# Altium PCB PB-PCB1.PcbDoc (part 3 of 4)
Units mm, origin at the board's own origin, x right, y up, seen from the top; angles counter-clockwise.
Board outline 179 x 85 mm, 2 copper layers (Top Layer, Bottom Layer); 468 components, 249 nets, 1291 pads, 562 vias.
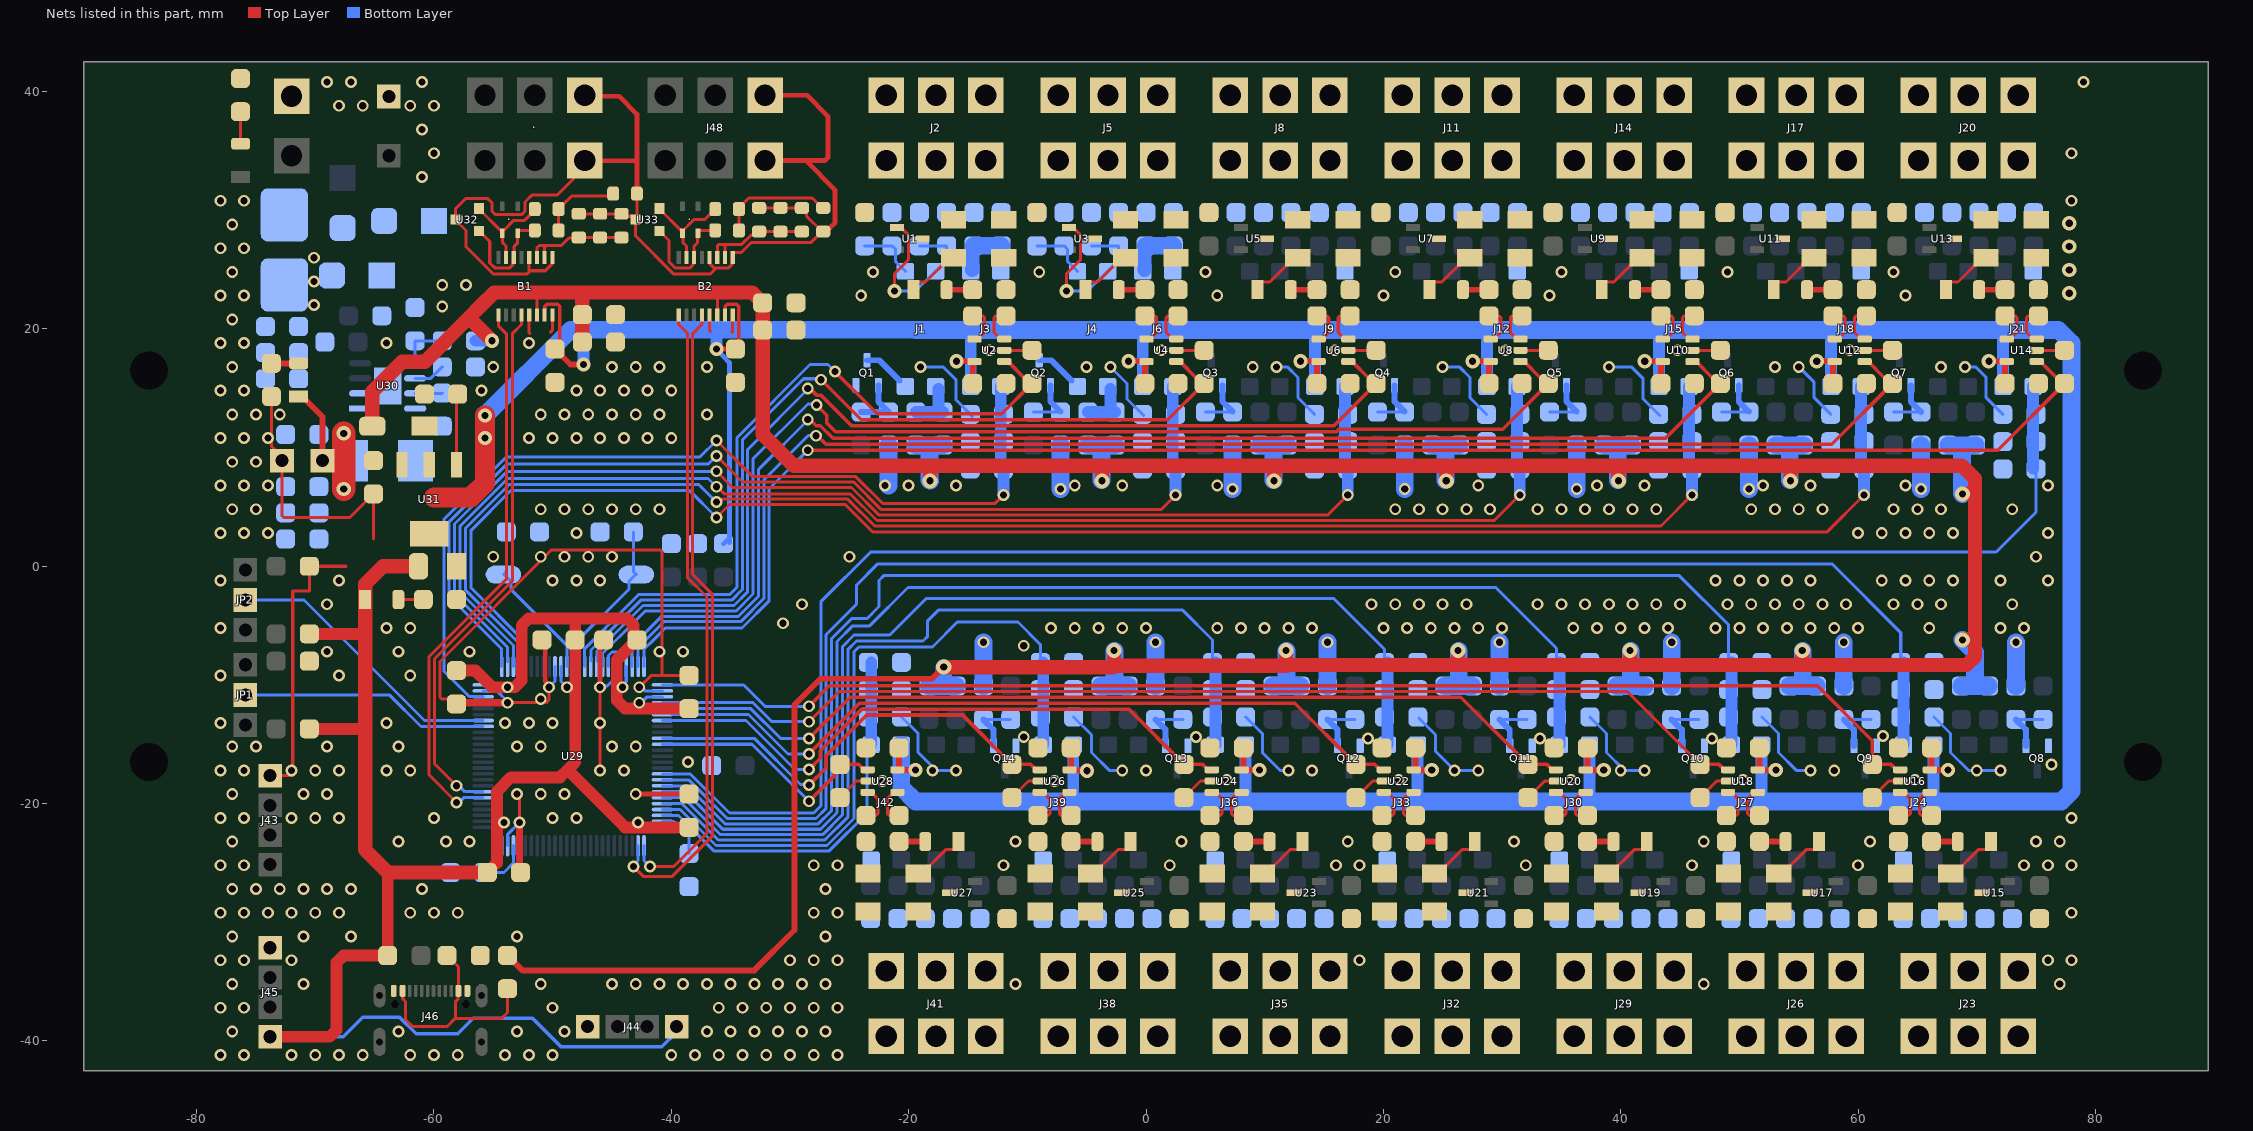
[diagram p2: the nets of this part, all layers, seen from the top]

## Via types
v1: diameter 1, hole 0.6, Top Layer to Bottom Layer, tented both sides, 509 vias
v2: diameter 1.2, hole 0.6, Top Layer to Bottom Layer, tented both sides, 39 vias
v3: diameter 1.27, hole 0.6, Top Layer to Bottom Layer, tented both sides, 14 vias

## Nets (pads, with @x,y where several pads share a name; then routed paths per layer and width w, separated by ;. In a path a pad name is that pad's centre, name@x,y a point inside that pad or via, vN(x,y) a via of type N, cw(c..) or ccw(c..) an arc to the next point about the centre after c; other vN are vias at no path point)
3v3MCU: B1.7 B2.7 C1.2 C4.2 C7.2 C10.2 C13.2 C16.2 C19.2 C22.2 C25.2 C28.2 C31.2 C34.2 C37.2 C40.2 C50.2 C51.2 C52.2 C53.2 C54.2 C55.2 C68.1 C69.1 C73.1 C80.1 D48.1 D49.1 J3.4 J6.4 J9.4 J12.4 J15.4 J18.4 J21.4 J24.4 J27.4 J30.4 J33.4 J36.4 J39.4 J42.4 J44.1 J45.1 R212.2 R213.2 R214.1 R216.2 U2.5 U4.5 U6.5 U8.5 U10.5 U12.5 U14.5 U16.5 U18.5 U20.5 U22.5 U24.5 U26.5 U28.5 U29.11 U29.19 U29.21 U29.22 U29.28 U29.50 U29.75 U29.100 U31.2 U31.4 | length 651.9
  Top Layer w0.3: B1.7@-50.675,21.175 -50.65,21.2 -50.65,21.899 -50.474,22.075 -49.576,22.075 -49.4,21.899 -49.4,18.7 C73.1@-49.8,18.3 ; B2.7@-35.45,21.2 -35.45,21.899 -35.274,22.075 -34.505,22.075 -34.3,21.87 -34.3,18.6 C80.1@-34.6,18.3 ; U28.5@-20.945,-17.15 U28.5@-20.92,-17.175 ; U2.5@-14.48,17.275 U2.5@-14.455,17.25 ; U4.5@0.02,17.275 U4.5@0.045,17.25 ; U24.5@8.055,-17.15 U24.5@8.08,-17.175 ; U6.5@14.52,17.275 U6.5@14.545,17.25 ; U22.5@22.555,-17.15 U22.5@22.58,-17.175 ; U8.5@29.02,17.275 U8.5@29.045,17.25 ; U20.5@37.055,-17.15 U20.5@37.08,-17.175 ; U10.5@43.52,17.275 U10.5@43.545,17.25 ; U18.5@51.555,-17.15 U18.5@51.58,-17.175 ; U12.5@58.02,17.275 U12.5@58.045,17.25 ; U16.5@66.055,-17.15 U16.5@66.08,-17.175 ; U14.5@72.52,17.275 U14.5@72.545,17.25
  Top Layer w0.4: v2(-36.2,18.3) C80.1@-34.6,18.3
  Top Layer w0.5: C73.1@-49.8,18.3 -48.5,17 v2(-47.4,17) ; U28.5@-20.92,-17.175 v2(-19.425,-17.175) ; U28.5@-20.8,-17.005 C40.2@-20.8,-15.3 ; v2(-15.975,17.275) U2.5@-14.48,17.275 ; C1.2@-14.6,15.4 U2.5@-14.6,17.105 ; U26.5@-6.3,-17.175 -6.285,-17.19 -5.021,-17.19 v2(-4.98,-17.23) ; U26.5@-6.3,-17.005 C37.2@-6.3,-15.3 ; v2(-1.475,17.275) U4.5@0.02,17.275 ; C4.2@-0.1,15.4 U4.5@-0.1,17.105 ; U24.5@8.08,-17.175 v2(9.575,-17.175) ; U24.5@8.2,-17.005 C34.2@8.2,-15.3 ; v2(13.025,17.275) U6.5@14.52,17.275 ; C7.2@14.4,15.4 U6.5@14.4,17.105 ; U22.5@22.58,-17.175 v2(24.075,-17.175) ; U22.5@22.7,-17.005 C31.2@22.7,-15.3 ; v2(27.525,17.275) U8.5@29.02,17.275 ; C10.2@28.9,15.4 U8.5@28.9,17.105 ; U20.5@37.08,-17.175 v2(38.575,-17.175) ; U20.5@37.2,-17.005 C28.2@37.2,-15.3 ; v2(42.025,17.275) U10.5@43.52,17.275 ; C13.2@43.4,15.4 U10.5@43.4,17.105 ; U18.5@51.58,-17.175 v2(53.075,-17.175) ; U18.5@51.7,-17.005 C25.2@51.7,-15.3 ; v2(56.525,17.275) U12.5@58.02,17.275 ; C16.2@57.9,15.4 U12.5@57.9,17.105 ; U16.5@66.08,-17.175 v2(67.575,-17.175) ; U16.5@66.2,-17.005 C22.2@66.2,-15.3 ; v2(71.025,17.275) U14.5@72.52,17.275 ; C19.2@72.4,15.4 U14.5@72.4,17.105
  Top Layer w1: J45.1@-73.8,-39.65 -68.786,-39.65 -68.2,-39.064 -68.2,-33.386 -67.614,-32.8 R214.1@-63.9,-32.8 -63.9,-25.8 ; R213.2@-70.5,-13.7 -65.8,-13.7 ; R216.2@-70.5,-5.7 -65.949,-5.7 -65.8,-5.551 ; C51.2@-58.1,-8.8 -56.5,-8.8 -55.1,-10.2 -53.186,-10.2 -52.6,-9.614 -52.6,-4.986 -52.014,-4.4 -48.1,-4.4 ; C55.2@-55.527,-25.827 C55.2@-55.5,-25.8 -54.7,-25 -54.7,-21.6 ; v1(-54.1,-21.6) -54.7,-21.6 ; v1(-48.8,-10.2) -48.1,-10.2 ; v1(-44.1,-10.2) v1@-44.6,-10.2 ; C50.2@-38.5,-22 -43.9,-22 -48.743,-17.157 ; C53.2@-38.5,-12 -42.2,-12 -43.9,-12 -44.6,-11.3 v1@-44.6,-10.2 ; -54.7,-21.6 -54.7,-18.986 -53.514,-17.8 -49.386,-17.8 -48.743,-17.157 ; -48.743,-17.157 -48.1,-16.514 -48.1,-10.2 ; -48.1,-10.2 C54.2@-48.1,-6.2 -48.1,-4.4 ; -48.1,-4.4 -43.759,-4.4 -43.173,-4.986 -43.173,-5.927 C52.2@-42.9,-6.2 -44.6,-7.9 v1@-44.6,-10.2
  Top Layer w1.2: C68.1@-61.3,0 -64.3,0 -65.8,-1.5 D48.1@-65.8,-2.8 -65.8,-5.551 -65.8,-13.7 -65.8,-23.9 -63.9,-25.8 C55.2@-55.5,-25.8
  Top Layer w1.7: -60,5.8 -56.9,5.8 -55.7,7 v2(-55.7,10.8) v2(-55.7,12.7)
  Bottom Layer w0.254: U29.100@-55.85,-10 v1@-54.202,-10 ; U29.75@-54.3,-23.55 v1@-54.3,-22.002 ; U29.11@-49.3,-8.45 -49.3,-9.7 v1(-48.8,-10.2) ; U29.19@-45.3,-8.45 -45.291,-8.441 -45.291,-7.517 -44.998,-7.223 -44.602,-7.223 -44.323,-7.502 -44.323,-7.665 -44.3,-7.688 U29.21@-44.3,-8.45 ; v1(-42.8,-21.6) -42.598,-21.6 -42.198,-22 U29.50@-40.75,-22 ; v1@-42.531,-11.5 -42.031,-11 U29.28@-40.75,-11
  Bottom Layer w0.28: v1@-44.3,-9.798 U29.21@-44.3,-8.45 ; v1@-44.1,-10.007 -43.8,-9.707 U29.22@-43.8,-8.45
  Bottom Layer w0.3: J45.1@-73.8,-39.65 -67.65,-39.65 -66,-38 -62.9,-38 -61.5,-39.4 -58,-39.4 -56.7,-38.1 -51.7,-38.1 -49.3,-40.5 -40.8,-40.5 -39.55,-39.25 J44.1@-39.55,-38.8 ; -16,19.92 -15.975,19.895
  Bottom Layer w0.4: v2(-36.2,18.3) -36.2,18.266 -35.6,17.666 -35.1,17.166 R212.2@-35.1,2 ; R212.2@-35.6,1.9 R212.2@-35.123,2.377
  Bottom Layer w0.5: v2(-15.975,17.275) -14.845,17.275 -14.77,17.2 ; -6.13,-17.2 -5.011,-17.2 v2(-4.98,-17.23) ; v2(-1.475,17.275) -1.45,17.3 -0.27,17.3 ; 8.37,-17.2 8.395,-17.175 v2(9.575,-17.175) ; v2(13.025,17.275) 14.155,17.275 14.23,17.2 ; 22.87,-17.2 24.05,-17.2 v2(24.075,-17.175) ; v2(27.525,17.275) 28.705,17.275 28.73,17.3 ; 37.37,-17.2 37.395,-17.175 v2(38.575,-17.175) ; v2(42.025,17.275) 43.205,17.275 43.23,17.3 ; 51.87,-17.2 53.05,-17.2 v2(53.075,-17.175) ; v2(56.525,17.275) 56.55,17.3 57.73,17.3 ; 66.37,-17.2 66.395,-17.175 v2(67.575,-17.175) ; v2(71.025,17.275) 72.155,17.275 72.23,17.2
  Bottom Layer w1: v2(-47.4,17) -47.4,19.92 ; v2(-36.2,18.3) -36.2,19.183 ; -20.63,-17.2 -19.45,-17.2 v2(-19.425,-17.175) ; J3.4@-14.77,15.15 -14.77,17.2 -14.77,19.92 ; -6.13,-19.82 -6.13,-17.2 J39.4@-6.13,-15.05 ; J6.4@-0.27,15.15 -0.27,17.3 -0.27,19.92 ; 8.37,-19.82 8.37,-17.2 J36.4@8.37,-15.05 ; J9.4@14.23,15.15 14.23,17.2 14.23,19.92 ; 22.87,-19.82 22.87,-17.2 J33.4@22.87,-15.05 ; J12.4@28.73,15.15 28.73,17.3 28.73,19.92 ; 37.37,-19.82 37.37,-17.2 J30.4@37.37,-15.05 ; J15.4@43.23,15.15 43.23,17.3 43.23,19.92 ; 51.87,-19.82 51.87,-17.2 J27.4@51.87,-15.05 ; J18.4@57.73,15.15 57.73,17.3 57.73,19.92 ; 66.37,-19.82 66.37,-17.2 J24.4@66.37,-15.05 ; J21.4@72.23,15.15 72.23,17.2 72.23,19.92
  Bottom Layer w1.5: v2(-55.7,12.7) -48.48,19.92 -47.4,19.92 ; -47.4,19.93 -36.2,19.93 -19.41,19.93 ; J42.4@-20.63,-15.05 -20.63,-17.2 -20.63,-18.615 -19.425,-19.82 -16,-19.82 -8.67,-19.82 -6.13,-19.82 -4.925,-19.82 -1.5,-19.82 5.83,-19.82 8.37,-19.82 9.575,-19.82 13,-19.82 20.33,-19.82 22.87,-19.82 24.075,-19.82 27.5,-19.82 34.83,-19.82 37.37,-19.82 38.575,-19.82 42,-19.82 49.33,-19.82 51.87,-19.82 53.075,-19.82 56.5,-19.82 63.83,-19.82 66.37,-19.82 67.575,-19.82 71,-19.82 76.18,-19.82 77.121,-19.82 78,-18.941 78,-18 78,18.8 76.88,19.92 72.23,19.92 71.025,19.92 67.6,19.92 60.27,19.92 57.73,19.92 56.525,19.92 53.1,19.92 45.77,19.92 43.23,19.92 42.025,19.92 38.6,19.92 31.27,19.92 28.73,19.92 27.525,19.92 24.1,19.92 16.77,19.92 14.23,19.92 13.025,19.92 9.6,19.92 2.27,19.92 -0.27,19.92 -1.475,19.92 -4.9,19.92 -12.23,19.92 -14.77,19.92 -15.975,19.92 -19.4,19.92
  Bottom Layer w1.7: v2(-55.7,10.8) v2(-55.7,12.7)
  other v1: -42.7,-11.5 -53.8,-10.2
5vMCU: B1.6 B2.6 C62.1 C63.1 C64.1 C65.1 C66.1 C67.1 C71.2 C72.2 C78.2 C79.2 D47.1 D49.2 FUSE_SMD1.1 L1.2 R4.2 R5.2 R19.2 R20.2 R34.2 R35.2 R49.2 R50.2 R64.2 R65.2 R79.2 R80.2 R94.2 R95.2 R109.2 R110.2 R124.2 R125.2 R139.2 R140.2 R154.2 R155.2 R169.2 R170.2 R184.2 R185.2 R199.2 R200.2 R221.2 U31.3 | length 430
  Top Layer w0.254: B1.6@-51.325,21.175 -51.325,23.075 ; B2.6@-36.125,21.175 -36.125,23.05
  Top Layer w0.5: D47.1@-71.4,14.3 -71.1,14.3 -69.4,12.6 C66.1@-69.4,8.9 ; FUSE_SMD1.1@-53.8,-32.8 -52.55,-34.05 -33.006,-34.05 -29.613,-30.657 -29.613,-11.67 -27.425,-9.481 -18.028,-9.481 -17.052,-8.505 v3(-17.045,-8.505)
  Top Layer w1.2: D49.2@-65.2,11.8 -65.2,14.7 -62.667,17.233 -60.767,17.233 -57,21 ; v2(-55.1,19) -57,20.9 -57,21 ; C72.2@-47.5,18.9 C71.2@-47.5,21.2 -47.5,23.075 ; -36.125,23.05 -36.1,23.075 ; v3(-18.2,7.2) -18.2,8.317 -18.358,8.475 ; v3(-17.045,-8.505) -2.78,-8.505 -2.65,-8.375 ; v3(-3.7,7.2) -3.7,8.425 -3.75,8.475 ; v3(-2.7,-7.1) -2.7,-8.325 -2.65,-8.375 ; v3(10.8,7.2) 10.8,8.425 10.75,8.475 ; v3(11.8,-7.1) 11.8,-8.325 ; v3(25.3,7.2) 25.3,8.425 25.25,8.475 ; v3(26.3,-7.1) 26.3,-8.325 ; v3(39.8,7.2) 39.8,8.425 39.75,8.475 ; v3(40.8,-7.1) 40.8,-8.325 ; v3(54.3,7.2) 54.3,8.425 54.25,8.475 ; v3(55.3,-7.1) 55.3,-8.325 ; v3(68.8,-6.2) 69.85,-6.2 ; v3(68.8,6.1) 69.85,6.1 ; -57,21 -56.097,21.903 -54.925,23.075 -51.325,23.075 -47.5,23.075 ; -47.5,23.075 -36.1,23.075 ; -36.1,23.075 -33.175,23.075 C79.2@-32.3,22.2 C78.2@-32.3,19.9 -32.3,11.1 -29.675,8.475 -18.358,8.475 ; -18.358,8.475 -3.75,8.475 ; -3.75,8.475 10.75,8.475 ; -2.65,-8.375 11.85,-8.375 11.8,-8.325 ; 10.75,8.475 25.25,8.475 ; 11.8,-8.325 26.3,-8.325 ; 25.25,8.475 39.75,8.475 ; 26.3,-8.325 40.8,-8.325 ; 39.75,8.475 54.25,8.475 ; 40.8,-8.325 55.3,-8.325 ; 54.25,8.475 68.75,8.475 69.85,7.375 69.85,6.1 ; 55.3,-8.325 69.147,-8.325 69.85,-7.622 69.85,-6.2 ; 69.85,-6.2 69.85,6.1
  Top Layer w2: v2(-67.6,6.5) v2(-67.6,11.2)
  Bottom Layer w1: R221.2@-56.5,19 v2(-55.1,19)
  Bottom Layer w1.4: -17.15,-10.1 -17.045,-9.995 v3(-17.045,-8.505)
  Bottom Layer w1.5: R4.2@-19.4,10.2 -18.25,10.2 ; R200.2@-18.3,-10.1 -17.15,-10.1 R199.2@-16,-10.1 ; v3(-18.2,7.2) -18.25,7.25 -18.25,10.2 ; R5.2@-17.1,10.2 -18.25,10.2 ; R19.2@-4.9,10.2 -3.75,10.2 ; R185.2@-3.8,-10.1 -2.65,-10.1 ; v3@-3.75,7.25 -3.75,10.2 ; v3@-2.65,-7.15 -2.65,-10.1 ; R20.2@-2.6,10.2 -3.75,10.2 ; R184.2@-1.5,-10.1 -2.65,-10.1 ; R34.2@9.6,10.2 10.75,10.2 ; R170.2@10.7,-10.1 11.85,-10.1 ; v3@10.75,7.25 10.75,10.2 ; v3@11.85,-7.15 11.85,-10.1 ; R35.2@11.9,10.2 10.75,10.2 ; R169.2@13,-10.1 11.85,-10.1 ; R49.2@24.1,10.2 25.25,10.2 ; R155.2@25.2,-10.1 26.35,-10.1 ; v3@25.25,7.25 25.25,10.2 ; v3@26.35,-7.15 26.35,-10.1 ; R50.2@26.4,10.2 25.25,10.2 ; R154.2@27.5,-10.1 26.35,-10.1 ; R64.2@38.6,10.2 39.75,10.2 ; R140.2@39.7,-10.1 40.85,-10.1 ; v3@39.75,7.25 39.75,10.2 ; v3@40.85,-7.15 40.85,-10.1 ; R65.2@40.9,10.2 39.75,10.2 ; R139.2@42,-10.1 40.85,-10.1 ; R79.2@53.1,10.2 54.25,10.2 ; R125.2@54.2,-10.1 55.35,-10.1 ; v3@54.25,7.25 54.25,10.2 ; v3@55.35,-7.15 55.35,-10.1 ; R80.2@55.4,10.2 54.25,10.2 ; R124.2@56.5,-10.1 55.35,-10.1 ; R94.2@67.6,10.2 68.75,10.2 ; R110.2@68.7,-10.1 69.85,-10.1 ; v3(68.8,-6.2) 69.85,-7.25 69.85,-10.1 ; v3(68.8,6.1) 68.75,6.15 68.75,10.2 ; R95.2@69.9,10.2 68.75,10.2 ; R109.2@71,-10.1 69.85,-10.1
24vMCU2: C59.1 C60.1 C61.1 D45.2 FH1.2 J2.2 J5.2 J8.2 J11.2 J14.2 J17.2 J20.2 J23.2 J26.2 J29.2 J32.2 J35.2 J38.2 J41.2 R1.1 R2.1 R3.1 R16.1 R17.1 R18.1 R31.1 R32.1 R33.1 R46.1 R47.1 R48.1 R61.1 R62.1 R63.1 R76.1 R77.1 R78.1 R91.1 R92.1 R93.1 R106.1 R107.1 R108.1 R121.1 R122.1 R123.1 R136.1 R137.1 R138.1 R151.1 R152.1 R153.1 R166.1 R167.1 R168.1 R181.1 R182.1 R183.1 R196.1 R197.1 R198.1 R222.1 U30.2
  other v1: -59.3,21.9 -70.1,22 -59.3,23.7 -57.3,23.7 -70.1,24 -70.1,26
analog_in_1: C2.1 U2.1 U29.15 | length 62.4
  Top Layer w0.3: v1(-26.2,16.4) -22.645,12.845 -12.155,12.845 C2.1@-9.6,15.4 -10.096,15.896 -10.281,15.896 -11.635,17.25 U2.1@-11.945,17.25
  Bottom Layer w0.254: U29.15@-47.3,-8.45 -47.3,-6.942 -43.734,-3.376 -42.758,-2.4 -35.1,-2.4 -34.473,-1.773 -34.473,10.827 -34.324,10.976 -28.305,16.995 -26.795,16.995 v1(-26.2,16.4)
analog_in_2: C5.1 U4.1 U29.16 | length 75.3
  Top Layer w0.3: v1(-27.374,15.718) -25.855,14.199 -24,12.345 1.845,12.345 C5.1@4.9,15.4 4.404,15.896 4.219,15.896 2.865,17.25 U4.1@2.555,17.25
  Bottom Layer w0.254: U29.16@-46.777,-8 -46.777,-7.061 -43.546,-3.83 -42.57,-2.854 -34.912,-2.854 -34.019,-1.961 -34.019,10.639 -33.87,10.788 -28.94,15.718 -28.924,15.718 -28.843,15.8 -27.455,15.8 v1(-27.374,15.718)
analog_in_3: C8.1 U6.1 U29.17 | length 88.6
  Top Layer w0.3: v1(-28.5,14.973) -28.311,14.973 -27.763,14.425 -27.398,14.425 -24.818,11.845 15.845,11.845 C8.1@19.4,15.4 18.904,15.896 18.719,15.896 17.365,17.25 U6.1@17.055,17.25
  Bottom Layer w0.254: U29.17@-46.277,-8 -46.277,-7.203 -43.358,-4.284 -42.382,-3.308 -34.724,-3.308 -33.565,-2.149 -33.565,9.846 -33.416,9.995 v1@-28.439,14.973
analog_in_4: C11.1 U8.1 U29.18 | length 102.3
  Top Layer w0.3: v1(-27.75,13.575) -26.888,12.713 -26.888,12.073 -26.16,11.345 16.052,11.345 16.257,11.55 30.05,11.55 C11.1@33.9,15.4 33.404,15.896 33.219,15.896 31.865,17.25 U8.1@31.555,17.25
  Bottom Layer w0.254: U29.18@-45.8,-8.45 -45.791,-8.441 -45.791,-7.359 -43.17,-4.738 -42.194,-3.762 -34.536,-3.762 -33.111,-2.337 -33.111,9.051 -32.962,9.2 -28.489,13.673 -27.849,13.673 v1(-27.75,13.575)
analog_in_5: C14.1 U10.1 U29.23 | length 113.3
  Top Layer w0.3: v1(-28.5,12.374) -28.311,12.374 -27.786,11.85 -27.448,11.85 -26.373,10.775 43.775,10.775 C14.1@48.4,15.4 47.904,15.896 47.719,15.896 46.365,17.25 U10.1@46.055,17.25
  Bottom Layer w0.254: U29.23@-43.3,-8.45 -43.3,-6.716 -41.776,-5.192 -40.8,-4.216 -34.348,-4.216 -32.657,-2.525 -32.657,8.157 -32.508,8.306 v1@-28.44,12.374
analog_in_6: C17.1 U12.1 U29.24 | length 126.1
  Top Layer w0.3: v1(-27.8,11) -27.694,11 -26.969,10.275 57.775,10.275 C17.1@62.9,15.4 62.404,15.896 62.219,15.896 60.865,17.25 U12.1@60.555,17.25
  Bottom Layer w0.254: U29.24@-42.8,-8.45 -42.791,-8.441 -42.791,-6.849 -41.588,-5.646 -40.612,-4.67 -34.16,-4.67 -32.203,-2.713 -32.203,7.272 -32.054,7.421 -28.456,11.019 -28.019,11.019 -28,11 v1(-27.8,11)
analog_in_7: C20.1 U14.1 U29.25 | length 139
  Top Layer w0.3: v1@-28.4,9.775 71.775,9.775 C20.1@77.4,15.4 76.904,15.896 76.719,15.896 75.365,17.25 U14.1@75.055,17.25
  Bottom Layer w0.254: U29.25@-42.3,-8.45 -42.3,-7 -41.4,-6.1 -40.5,-5.2 -34.048,-5.2 -31.749,-2.901 -31.749,6.522 -31.6,6.671 v1@-28.496,9.775
  other v1: -28.5,9.775
analog_in_8: C23.1 U16.1 U29.26 | length 109.9
  Top Layer w0.3: v1(-28.4,-11.8) -26.681,-10.081 56.581,-10.081 61.2,-14.7 C23.1@61.2,-16.7 62.785,-16.7 63.235,-17.15 U16.1@63.545,-17.15
  Bottom Layer w0.254: U29.26@-40.75,-10 -33.9,-10 -32.1,-11.8 v1(-28.4,-11.8)
analog_in_9: C26.1 U18.1 U29.29 | length 94.2
  Top Layer w0.254: v1(-28.4,-13.1) -25.858,-10.558 40.558,-10.558 C26.1@46.7,-16.7
  Top Layer w0.3: C26.1@46.7,-16.7 48.285,-16.7 48.735,-17.15 U18.1@49.045,-17.15
  Bottom Layer w0.254: U29.29@-40.75,-11.5 -33.108,-11.5 -31.508,-13.1 v1(-28.4,-13.1)
analog_in_10: C29.1 U20.1 U29.30 | length 80.3
  Top Layer w0.3: v1(-28.4,-14.5) -24.935,-11.035 26.535,-11.035 C29.1@32.2,-16.7 33.785,-16.7 34.235,-17.15 U20.1@34.545,-17.15
  Bottom Layer w0.254: U29.30@-40.75,-12 -33.3,-12 -30.8,-14.5 v1(-28.4,-14.5)
analog_in_11: C32.1 U22.1 U29.31 | length 65.5
  Top Layer w0.3: v1(-28.4,-15.829) -28.4,-15.793 -24.142,-11.535 12.535,-11.535 C32.1@17.7,-16.7 19.285,-16.7 19.735,-17.15 U22.1@20.045,-17.15
  Bottom Layer w0.254: U29.31@-39.954,-12.5 -33.5,-12.5 -30.171,-15.829 v1(-28.4,-15.829)
analog_in_12: C35.1 U24.1 U29.32 | length 52.6
  Top Layer w0.3: v1(-28.4,-17.129) -27.45,-16.179 -27.45,-15.55 -23.935,-12.035 -1.465,-12.035 C35.1@3.2,-16.7 4.785,-16.7 5.235,-17.15 U24.1@5.545,-17.15
  Bottom Layer w0.254: U29.32@-40.75,-13 -33.7,-13 -29.571,-17.129 v1(-28.4,-17.129)
analog_in_13: C38.1 U26.1 U29.35 | length 38.4
  Top Layer w0.3: v1(-28.402,-18.429) -26.95,-16.977 -26.95,-15.95 -23.535,-12.535 -15.465,-12.535 C38.1@-11.3,-16.7 -9.715,-16.7 -9.265,-17.15 U26.1@-8.955,-17.15
  Bottom Layer w0.254: U29.35@-40.75,-14.5 -33,-14.5 -29.106,-18.394 -28.436,-18.394 v1(-28.402,-18.429)
analog_in_14: C41.1 U28.1 U29.36 | length 21
  Top Layer w0.3: v1(-28.4,-19.8) -27.722,-19.122 -26.251,-17.651 -26.251,-17.151 C41.1@-25.8,-16.7 -24.215,-16.7 -23.765,-17.15 U28.1@-23.455,-17.15
  Bottom Layer w0.254: U29.36@-40.75,-15 -33.2,-15 v1(-28.4,-19.8)
Boot0: JP2.2 U29.94 | length 24.3
  Bottom Layer w0.254: JP2.2@-75.9,-2.84 -70.96,-2.84 -60.8,-13 U29.94@-55.85,-13
com1: J2.6 R12.2 R13.2
com2: J5.6 R27.2 R28.2
com3: J8.6 R42.2 R43.2
com4: J11.6 R57.2 R58.2
com5: J14.6 R72.2 R73.2
com6: J17.6 R87.2 R88.2
com7: J20.6 R102.2 R103.2
com8: J23.6 R117.2 R118.2
com9: J26.6 R132.2 R133.2
com10: J29.6 R147.2 R148.2
com11: J32.6 R162.2 R163.2
com12: J35.6 R177.2 R178.2
com13: J38.6 R192.2 R193.2
com14: J41.6 R207.2 R208.2
digital_in_1: C3.1 J3.3 R14.2 R15.2 U29.98 | length 78.5
  Top Layer w0.254: v1(-36.2,10.6) -33.148,7.548 -24.448,7.548 -22.2,5.3 -12.7,5.3 v1(-12,6)
  Bottom Layer w0.254: U29.98@-55.85,-11 -55.859,-10.991 -57.009,-10.991 -59.17,-8.83 -59.17,3.94 -53.91,9.2 -37.6,9.2 v1(-36.2,10.6)
  Bottom Layer w1: R14.2@-12.245,8.215 -12.245,10.5 -12.245,12.8 J3.3@-12.245,15.135 ; v1(-12,6) R14.2@-12,8.2
digital_in_2: C6.1 J6.3 R29.2 R30.2 U29.1 | length 89
  Top Layer w0.254: v1(-36.2,9.3) -33.994,7.094 -24.636,7.094 -22.342,4.8 1.3,4.8 v1(2.5,6)
  Bottom Layer w0.254: U29.1@-54.3,-8.45 -54.3,-6.968 -58.716,-2.552 -58.716,3.752 -53.868,8.6 -36.9,8.6 v1(-36.2,9.3)
  Bottom Layer w1: R29.2@2.255,8.215 2.255,10.5 2.255,12.8 J6.3@2.255,15.135 ; v1(2.5,6) R29.2@2.5,8.2
digital_in_3: C9.1 J9.3 R44.2 R45.2 U29.2 | length 101.9
  Top Layer w0.254: v1(-36.2,8) -34.84,6.64 -24.824,6.64 -22.484,4.3 15.3,4.3 v1(17,6)
  Bottom Layer w0.254: U29.2@-53.8,-8.069 -53.8,-6.826 -58.262,-2.364 -58.262,3.564 -53.826,8 v1(-36.2,8)
  Bottom Layer w1: R44.2@16.755,8.215 16.755,10.5 16.755,12.8 J9.3@16.755,15.135 ; v1(17,6) R44.2@17,8.2
digital_in_4: C12.1 J12.3 R59.2 R60.2 U29.3 | length 116.1
  Top Layer w0.254: v1@-36.255,6.557 -35.995,6.557 -35.546,6.108 -24.934,6.108 -22.672,3.846 29.346,3.846 v1(31.5,6)
  Bottom Layer w0.254: U29.3@-53.3,-8.45 -53.3,-6.684 -57.808,-2.176 -57.808,3.376 -53.784,7.4 -36.9,7.4 v1(-36.2,6.7)
  Bottom Layer w1: R59.2@31.255,8.215 31.255,10.5 31.255,12.8 J12.3@31.255,15.135 ; v1(31.5,6) R59.2@31.5,8.2
digital_in_5: C15.1 J15.3 R74.2 R75.2 U29.4 | length 130.3
  Top Layer w0.254: v1(-36.2,5.4) -35.998,5.4 -35.744,5.654 -25.122,5.654 -22.86,3.392 43.392,3.392 v1(46,6)
  Bottom Layer w0.254: U29.4@-52.8,-8.45 -52.8,-6.542 -57.354,-1.988 -57.354,3.188 -53.642,6.9 -37.7,6.9 v1(-36.2,5.4)
  Bottom Layer w1: R74.2@45.755,8.215 45.755,10.5 45.755,12.8 J15.3@45.755,15.135 ; v1(46,6) R74.2@46,8.2
digital_in_6: C18.1 J18.3 R89.2 R90.2 U29.5 | length 144.9
  Top Layer w0.254: v1(-36.2,4.1) -35.1,5.2 -25.342,5.2 -23.042,2.9 57.4,2.9 v1(60.5,6)
  Bottom Layer w0.254: U29.5@-52.3,-8.45 -52.3,-6.4 -56.9,-1.8 -56.9,3 -53.5,6.4 -38.5,6.4 v1(-36.2,4.1)
  Bottom Layer w1: R89.2@60.255,8.215 60.255,10.5 60.255,12.8 J18.3@60.255,15.135 ; v1(60.5,6) R89.2@60.5,8.2
digital_in_7: C21.1 J21.3 R104.2 R105.2 U29.41 | length 148.3
  Bottom Layer w0.254: U29.41@-40.75,-17.5 -38.4,-17.5 -35.1,-20.8 -28,-20.8 -27.4,-20.2 -27.4,-3 -23.2,1.2 71.642,1.2 75,4.558 R104.2@75,8.2
  Bottom Layer w1: R104.2@74.755,8.215 74.755,10.5 74.755,12.8 J21.3@74.755,15.135
digital_in_8: C24.1 J24.3 R119.2 R120.2 U29.42 | length 135.9
  Bottom Layer w0.254: U29.42@-40.75,-18 -38.542,-18 -35.288,-21.254 -27.812,-21.254 -26.946,-20.388 -26.946,-5.746 -24.4,-3.2 -24.4,-1.6 -22.6,0.2 57.8,0.2 63.6,-5.6 R119.2@63.6,-8.1
  Bottom Layer w1: J24.3@63.845,-15.035 63.845,-12.7 63.845,-10.4 R119.2@63.845,-8.115
digital_in_9: C27.1 J27.3 R134.2 R135.2 U29.43 | length 121.4
  Bottom Layer w0.254: U29.43@-40.75,-18.5 -38.684,-18.5 -35.476,-21.708 -27.624,-21.708 -26.492,-20.576 -26.492,-6.092 -24.8,-4.4 -23.5,-4.4 -22.5,-3.4 -22.5,-1.2 -22.1,-0.8 44.942,-0.8 49.1,-4.958 R134.2@49.1,-8.1
  Bottom Layer w1: J27.3@49.345,-15.035 49.345,-12.7 49.345,-10.4 R134.2@49.345,-8.115
digital_in_10: C30.1 J30.3 R149.2 R150.2 U29.44 | length 103.8
  Bottom Layer w0.254: U29.44@-40.75,-19 -38.826,-19 -35.664,-22.162 -27.436,-22.162 -26.038,-20.764 -26.038,-6.338 -24.716,-5.015 -23.285,-5.015 -20.062,-1.792 29.473,-1.792 34.6,-6.919 R149.2@34.6,-8.1
  Bottom Layer w1: J30.3@34.845,-15.035 34.845,-12.7 34.845,-10.4 R149.2@34.845,-8.115
digital_in_11: C33.1 J33.3 R164.2 R165.2 U29.45 | length 88.5
  Bottom Layer w0.254: U29.45@-40.75,-19.5 -38.968,-19.5 -35.852,-22.616 -27.248,-22.616 -25.584,-20.952 -25.584,-6.784 -24.6,-5.8 -21.6,-5.8 -18.5,-2.7 15.8,-2.7 20.1,-7 R164.2@20.1,-8.1
  Bottom Layer w1: J33.3@20.345,-15.035 20.345,-12.7 20.345,-10.4 R164.2@20.345,-8.115
digital_in_12: C36.1 J36.3 R179.2 R180.2 U29.46 | length 74.5
  Bottom Layer w0.254: U29.46@-40.75,-20 -39.11,-20 -36.04,-23.07 -27.06,-23.07 -25.13,-21.14 -25.13,-7.03 -24.4,-6.3 -18.8,-6.3 -18.4,-5.9 -18.4,-4.6 -17.5,-3.7 3.088,-3.7 5.6,-6.212 R179.2@5.6,-8.1
  Bottom Layer w1: J36.3@5.845,-15.035 5.845,-12.7 5.845,-10.4 R179.2@5.845,-8.115
digital_in_13: C39.1 J39.3 R194.2 R195.2 U29.47 | length 58.3
  Bottom Layer w0.254: U29.47@-40.75,-20.5 -39.252,-20.5 -36.228,-23.524 -26.872,-23.524 -24.6,-21.252 -24.6,-7.2 -24.2,-6.8 -18,-6.8 -15.9,-4.7 -10.788,-4.7 -8.9,-6.588 R194.2@-8.9,-8.1
  Bottom Layer w1: J39.3@-8.655,-15.035 -8.655,-12.7 -8.655,-10.4 R194.2@-8.655,-8.115
digital_in_14: C42.1 J42.3 R209.2 R210.2 U29.48 | length 32.6
  Bottom Layer w0.254: U29.48@-40.75,-21 -39.394,-21 -36.416,-23.978 -26.684,-23.978 -23.5,-20.794 -23.5,-15.38 J42.3@-23.17,-15.05
  Bottom Layer w1: J42.3@-23.155,-15.035 -23.155,-12.7 -23.155,-10.4 R209.2@-23.155,-8.115
digital_out_1: Q1.1 R8.2 R9.1 | length 4.9
  Bottom Layer w0.5: R8.2@-24,13 R9.1@-21.7,13 ; Q1.1@-22.55,15.24 -22.55,13.875 R9.1@-21.7,13.025
digital_out_2: Q2.1 R23.2 R24.1 | length 4.9
  Bottom Layer w0.254: R23.2@-9.5,13 R24.1@-7.2,13
  Bottom Layer w0.5: Q2.1@-8.05,15.24 -8.05,13.875 R24.1@-7.2,13.025
digital_out_3: Q3.1 R38.2 R39.1 | length 4.9
  Bottom Layer w0.254: R38.2@5,13 7.275,13 R39.1@7.3,13.025
  Bottom Layer w0.5: Q3.1@6.45,15.24 6.45,13.875 R39.1@7.3,13.025
digital_out_4: Q4.1 R53.2 R54.1 | length 4.9
  Bottom Layer w0.254: R53.2@19.5,13 21.775,13 R54.1@21.8,13.025
  Bottom Layer w0.5: Q4.1@20.95,15.24 20.95,13.875 R54.1@21.8,13.025
digital_out_5: Q5.1 R68.2 R69.1 | length 4.9
  Bottom Layer w0.254: R68.2@34,13 36.275,13 R69.1@36.3,13.025
  Bottom Layer w0.5: Q5.1@35.45,15.24 35.45,13.875 R69.1@36.3,13.025
digital_out_6: Q6.1 R83.2 R84.1 | length 4.9
  Bottom Layer w0.254: R83.2@48.5,13 50.775,13 R84.1@50.8,13.025
  Bottom Layer w0.5: Q6.1@49.95,15.24 49.95,13.875 R84.1@50.8,13.025
digital_out_7: Q7.1 R98.2 R99.1 | length 4.9
  Bottom Layer w0.254: R98.2@63,13 R99.1@65.3,13
  Bottom Layer w0.5: Q7.1@64.45,15.24 64.45,13.875 65.3,13.025 R99.1@65.3,13
digital_out_8: Q8.1 R113.2 R114.1 | length 4.9
  Bottom Layer w0.254: R114.1@73.3,-12.925 73.325,-12.9 R113.2@75.6,-12.9
  Bottom Layer w0.5: R114.1@73.3,-12.925 74.15,-13.775 Q8.1@74.15,-15.14
digital_out_9: Q9.1 R128.2 R129.1 | length 4.9
  Bottom Layer w0.254: R129.1@58.8,-12.9 R128.2@61.1,-12.9
  Bottom Layer w0.5: R129.1@58.8,-12.925 59.65,-13.775 Q9.1@59.65,-15.14
digital_out_10: Q10.1 R143.2 R144.1 | length 4.9
  Bottom Layer w0.254: R144.1@44.3,-12.9 R143.2@46.6,-12.9
  Bottom Layer w0.5: R144.1@44.3,-12.925 45.15,-13.775 Q10.1@45.15,-15.14
digital_out_11: Q11.1 R158.2 R159.1 | length 4.9
  Bottom Layer w0.254: R159.1@29.8,-12.925 29.825,-12.9 R158.2@32.1,-12.9
  Bottom Layer w0.5: R159.1@29.8,-12.925 30.65,-13.775 Q11.1@30.65,-15.14
digital_out_12: Q12.1 R173.2 R174.1 | length 4.9
  Bottom Layer w0.254: R174.1@15.3,-12.9 R173.2@17.6,-12.9
  Bottom Layer w0.5: R174.1@15.3,-12.925 16.15,-13.775 Q12.1@16.15,-15.14
digital_out_13: Q13.1 R188.2 R189.1 | length 4.9
  Bottom Layer w0.254: R189.1@0.8,-12.925 0.825,-12.9 R188.2@3.1,-12.9
  Bottom Layer w0.5: R189.1@0.8,-12.925 1.65,-13.775 Q13.1@1.65,-15.14
digital_out_14: Q14.1 R203.2 R204.1 | length 4.9
  Bottom Layer w0.254: R204.1@-13.7,-12.9 R203.2@-11.4,-12.9
  Bottom Layer w0.5: R204.1@-13.7,-12.925 -12.85,-13.775 Q14.1@-12.85,-15.14
feedback: ..2@-61.6,19 R221.1 U30.5 | length 4.2
  Bottom Layer w0.254: U30.5@-61.584,17.105 -61.6,17.121 ..2@-61.6,19 R221.1@-59.3,19
MCUGND: ..1@-61.6,21.8 ..2@-64.4,21.1 B1.5 B1.8 B2.5 B2.8 C1.1 C2.2 C3.2 C4.1 C5.2 C6.2 C7.1 C8.2 C9.2 C10.1 C11.2 C12.2 C13.1 C14.2 C15.2 C16.1 C17.2 C18.2 C19.1 C20.2 C21.2 C22.1 C23.2 C24.2 C25.1 C26.2 C27.2 C28.1 C29.2 C30.2 C31.1 C32.2 C33.2 C34.1 C35.2 C36.2 C37.1 C38.2 C39.2 C40.1 C41.2 C42.2 C43.1 C44.1 C45.1 C46.1 C47.1 C48.1 C49.1 C50.1 C51.1 C52.1 C53.1 C54.1 C55.1 C56.2 C57.2 C59.2 C60.2 C61.2 C62.2 C63.2 C64.2 C65.2 C66.2 C67.2 C68.2 C69.2 C71.1 C72.1 C73.2 C78.1 C79.1 C80.2 D44.1 D45.1 J2.1 J2.4 J3.2 J5.1 J5.4 J6.2 J8.1 J8.4 J9.2 J11.1 J11.4 J12.2 J14.1 J14.4 J15.2 J17.1 J17.4 J18.2 J20.1 J20.4 J21.2 J23.1 J23.4 J24.2 J26.1 J26.4 J27.2 J29.1 J29.4 J30.2 J32.1 J32.4 J33.2 J35.1 J35.4 J36.2 J38.1 J38.4 J39.2 J41.1 J41.4 J42.2 J43.4 J44.4 J45.4 J46.A1B12 J46.B1A12 POWER1.1 Q1.2 Q2.2 Q3.2 Q4.2 Q5.2 Q6.2 Q7.2 Q8.2 Q9.2 Q10.2 Q11.2 Q12.2 Q13.2 Q14.2 R6.2 R7.2 R9.2 R11.2 R14.1 R15.1 R21.2 R22.2 R24.2 R26.2 R29.1 R30.1 R36.2 R37.2 R39.2 R41.2 R44.1 R45.1 R51.2 R52.2 R54.2 R56.2 R59.1 R60.1 R66.2 R67.2 R69.2 R71.2 R74.1 R75.1 R81.2 R82.2 R84.2 R86.2 R89.1 R90.1 R96.2 R97.2 R99.2 R101.2 R104.1 R105.1 R111.2 R112.2 R114.2 R116.2 R119.1 R120.1 R126.2 R127.2 R129.2 R131.2 R134.1 R135.1 R141.2 R142.2 R144.2 R146.2 R149.1 R150.1 R156.2 R157.2 R159.2 R161.2 R164.1 R165.1 R171.2 R172.2 R174.2 R176.2 R179.1 R180.1 R186.2 R187.2 R189.2 R191.2 R194.1 R195.1 R201.2 R202.2 R204.2 R206.2 R209.1 R210.1 R211.2 R215.2 R217.2 R218.1 R219.1 R220.1 U2.2 U2.4 U4.2 U4.4 U6.2 U6.4 U8.2 U8.4 U10.2 U10.4 U12.2 U12.4 U14.2 U14.4 U16.2 U16.4 U18.2 U18.4 U20.2 U20.4 U22.2 U22.4 U24.2 U24.4 U26.2 U26.4 U28.2 U28.4 U29.10 U29.20 U29.27 U29.74 U29.99 U30.1 U30.9 U31.1 | length 378.8
  Top Layer w0.254: J43.4@-73.8,-17.65 -71.9,-17.65 -71.9,-2.1 -70.5,-2.1 R217.2@-70.5,0 -67.4,0 ; R219.1@-73.7,14.3 -73.7,10.1 -72.8,9.2 C66.2@-72.8,8.9 -72.8,4.249 -72.651,4.1 -67.1,4.1 C67.2@-65.1,6.1 -65.1,2.3 ; U31.1@-58.099,8.549 -58.099,14.5 C69.2@-58,14.5 ; C51.1@-58,-11.5 C51.1@-58.1,-11.6 -58.518,-11.182 -59.351,-11.182 -59.5,-11.033 -59.5,-8.022 -50.1,1.378 -40.949,1.378 -40.8,1.23 -40.8,-9.2 ; v1@-53.85,-11.45 v1(-53.8,-11.5) -50.549,-11.5 -50.3,-11.251 v1(-50.3,-10.2) v1@-50.3,-10.005 ; C55.1@-52.8,-25.7 C55.1@-52.7,-25.8 ; v1(-52.8,-21.6) v1@-52.8,-19.2 ; B1.5@-51.975,21.175 -51.975,19.675 -51.9,19.6 ; C54.1@-50.9,-6.2 C54.1@-50.627,-6.473 ; -50.2,19.7 -50.025,19.875 B1.8@-50.025,21.175 ; v1(-46,-17.2) v1(-46,-10.2) ; C52.1@-45.7,-6.2 C52.1@-45.3,-6.6 ; v1(-42.7,-10.2) -41.7,-9.2 -40.8,-9.2 ; C53.1@-38.5,-9.2 -40.8,-9.2 ; B2.5@-36.775,21.175 -36.775,19.875 -36.7,19.8 ; -34.9,19.7 -34.825,19.775 B2.8@-34.825,21.175 ; C41.2@-25.8,-19.5 -24.4,-18.1 U28.2@-23.455,-18.1 ; U28.4@-20.945,-19.05 -21.25,-19.05 -21.8,-19.6 -21.8,-20.851 -21.651,-21 R206.2@-20.8,-21 ; R11.2@-14.6,21.1 -13.749,21.1 -13.6,20.951 -13.6,19.7 -14.15,19.15 U2.4@-14.455,19.15 ; U2.2@-11.945,18.2 C2.2@-9.6,18.2 ; C38.2@-11.3,-19.5 -9.9,-18.1 U26.2@-8.955,-18.1 ; U26.4@-6.445,-19.05 -6.75,-19.05 -7.3,-19.6 -7.3,-20.851 -7.151,-21 R191.2@-6.3,-21 ; R26.2@-0.1,21.1 0.751,21.1 0.9,20.951 0.9,19.7 0.35,19.15 U4.4@0.045,19.15 ; U4.2@2.555,18.2 C5.2@4.9,18.2 ; C35.2@3.2,-19.5 4.6,-18.1 U24.2@5.545,-18.1 ; U24.4@8.055,-19.05 7.75,-19.05 7.2,-19.6 7.2,-20.851 7.349,-21 R176.2@8.2,-21 ; R41.2@14.4,21.1 15.251,21.1 15.4,20.951 15.4,19.7 14.85,19.15 U6.4@14.545,19.15 ; U6.2@17.055,18.2 C8.2@19.4,18.2 ; C32.2@17.7,-19.5 19.1,-18.1 U22.2@20.045,-18.1 ; U22.4@22.555,-19.05 22.25,-19.05 21.7,-19.6 21.7,-20.851 21.849,-21 R161.2@22.7,-21 ; R56.2@28.9,21.1 29.751,21.1 29.9,20.951 29.9,19.7 29.35,19.15 U8.4@29.045,19.15 ; U8.2@31.555,18.2 C11.2@33.9,18.2 ; C29.2@32.2,-19.5 33.6,-18.1 U20.2@34.545,-18.1 ; U20.4@37.055,-19.05 36.75,-19.05 36.2,-19.6 36.2,-20.851 36.349,-21 R146.2@37.2,-21 ; R71.2@43.4,21.1 44.251,21.1 44.4,20.951 44.4,19.7 43.85,19.15 U10.4@43.545,19.15 ; U10.2@46.055,18.2 C14.2@48.4,18.2 ; C26.2@46.7,-19.5 48.1,-18.1 U18.2@49.045,-18.1 ; U18.4@51.555,-19.05 51.25,-19.05 50.7,-19.6 50.7,-20.851 50.849,-21 R131.2@51.7,-21 ; R86.2@57.9,21.1 58.751,21.1 58.9,20.951 58.9,19.7 58.35,19.15 U12.4@58.045,19.15 ; U12.2@60.555,18.2 C17.2@62.9,18.2 ; C23.2@61.2,-19.5 62.6,-18.1 U16.2@63.545,-18.1 ; U16.4@66.055,-19.05 65.75,-19.05 65.2,-19.6 65.2,-20.851 65.349,-21 R116.2@66.2,-21 ; R101.2@72.4,21.1 73.251,21.1 73.4,20.951 73.4,19.7 72.85,19.15 U14.4@72.545,19.15 ; U14.2@75.055,18.2 C20.2@77.4,18.2
  Top Layer w0.4: C54.1@-50.627,-6.473 -50.627,-9.678 v1@-50.3,-10.005 ; v1(-46,-10.2) -46,-6.785 -45.815,-6.6 C52.1@-45.3,-6.6 ; v1(-43,-19.2) C50.1@-38.5,-19.2
  Top Layer w0.6: C51.1@-58,-11.5 v1(-53.8,-11.5) ; C55.1@-52.8,-25.7 v1(-52.8,-21.6)
  Bottom Layer w0.254: U29.99@-55.85,-10.5 -54.7,-10.5 -53.8,-11.4 v1(-53.8,-11.5) ; U29.74@-53.8,-23.55 -53.791,-23.541 -53.791,-22.591 v1(-52.8,-21.6) ; v1(-50.3,-10.2) -49.8,-9.7 U29.10@-49.8,-8.45 ; v1(-46,-10.2) -45.881,-10.081 -45.381,-10.081 -44.8,-9.5 U29.20@-44.8,-8.45 ; v1(-42.7,-10.2) -42.498,-10.2 -42.198,-10.5 U29.27@-40.75,-10.5 ; C42.2@-20.6,-12.7 -19.2,-14.1 -19.2,-15.7 -17.7,-17.2 v1(-16,-17.2) ; v1@-18.825,16.8 -17.1,16.8 -16,15.7 -16,14 C3.2@-14.6,12.6 ; C39.2@-6.1,-12.7 -4.6,-14.2 -4.6,-15.7 -3.1,-17.2 v1(-2,-17.2) ; v1@-3.4,16.7 -2.9,16.7 -1.6,15.4 -1.6,14.1 C6.2@-0.2,12.7 ; C36.2@8.4,-12.7 9.8,-14.1 9.8,-15.7 11.3,-17.2 v1(12,-17.2) ; v1(11,16.8) 11.9,16.8 12.8,15.9 12.8,14.2 C9.2@14.2,12.8 ; C33.2@23,-12.8 24.4,-14.2 24.4,-15.6 v1(26,-17.2) v1(28,-17.2) ; v1(25,16.8) 26.4,16.8 27.3,15.9 27.3,14.2 C12.2@28.7,12.8 ; C30.2@37.4,-12.7 38.8,-14.1 38.8,-15.7 40.3,-17.2 v1@42,-17.2 ; v1(39,16.8) 40.9,16.8 41.9,15.8 41.9,14.1 C15.2@43.3,12.7 ; C27.2@51.9,-12.7 53.3,-14.1 53.3,-15.7 54.8,-17.2 v1(56,-17.2) ; v1(55,16.8) 56.3,15.5 56.3,14.2 C18.2@57.7,12.8 ; C24.2@66.4,-12.7 67.8,-14.1 67.8,-15.7 69.3,-17.2 v1@72,-17.2 ; v1(69,16.8) 69.9,16.8 70.8,15.9 70.8,14.2 C21.2@72.2,12.8
  Bottom Layer w1.5: v1@-21.7,6.8 R9.2@-21.7,10.2 ; R204.2@-13.7,-10.1 v1(-13.7,-6.4) ; v1(-7.2,6.5) R24.2@-7.2,10.2 ; R189.2@0.8,-10.1 v1(0.8,-6.4) ; v1(7.3,6.5) R39.2@7.3,10.2 ; R174.2@15.3,-10.1 v1(15.3,-6.4) ; v1(21.8,6.5) R54.2@21.8,10.2 ; R159.2@29.8,-10.1 v1(29.8,-6.4) ; v1(36.3,6.5) R69.2@36.3,10.2 ; R144.2@44.3,-10.1 v1(44.3,-6.4) ; v1(50.8,6.5) R84.2@50.8,10.2 ; R129.2@58.8,-10.1 v1(58.8,-6.4) ; v1(65.3,6.5) R99.2@65.3,10.2 ; R114.2@73.3,-10.1 v1(73.3,-6.4)
  Bottom Layer w1.7: J23.4@73.5,-34.109 J23.4@73.577,-34.186
  other v1: -78,-41.2 -76,-41.2 -72,-41.2 -70,-41.2 -68,-41.2 -66,-41.2 -62,-41.2 -60,-41.2 -58,-41.2 -54,-41.2 -52,-41.2 -50,-41.2 -40,-41.2 -38,-41.2 -36,-41.2 -34,-41.2 -32,-41.2 -30,-41.2 -28,-41.2 -26,-41.2 -77,-39.2 -63,-39.2 -53,-39.2 -49,-39.2 -37,-39.2 -35,-39.2 -33,-39.2 -31,-39.2 -29,-39.2 -27,-39.2 -78,-37.2 -76,-37.2 -50,-37.2 -36,-37.2 -34,-37.2 -32,-37.2 -30,-37.2 -28,-37.2 -26,-37.2 -77,-35.2 -71,-35.2 -51,-35.2 -45,-35.2 -43,-35.2 -41,-35.2 -39,-35.2 -37,-35.2 -35,-35.2 -33,-35.2 -31,-35.2 -29,-35.2 -27,-35.2 -11,-35.2 47,-35.2 77,-35.2 -78,-33.2 -76,-33.2 -72,-33.2 -30,-33.2 -28,-33.2 -26,-33.2 18,-33.2 76,-33.2 78,-33.2 -77,-31.2 -71,-31.2 -67,-31.2 -53,-31.2 -27,-31.2 -78,-29.2 -76,-29.2 -74,-29.2 -72,-29.2 -70,-29.2 -68,-29.2 -62,-29.2 -60,-29.2 -58,-29.2 -28,-29.2 -26,-29.2 78,-29.2 -77,-27.2 -75,-27.2 -73,-27.2 -71,-27.2 -69,-27.2 -67,-27.2 -61,-27.2 -27,-27.2 -78,-25.2 -76,-25.2 -28,-25.2 -26,-25.2 -12,-25.2 2,-25.2 16,-25.2 18,-25.2 32,-25.2 46,-25.2 60,-25.2 74,-25.2 76,-25.2 78,-25.2 -77,-23.2 -63,-23.2 -59,-23.2 -57,-23.2 -11,-23.2 3,-23.2 17,-23.2 31,-23.2 47,-23.2 61,-23.2 75,-23.2 77,-23.2 -78,-21.2 -76,-21.2 -72,-21.2 -70,-21.2 -68,-21.2 -60,-21.2 -50,-21.2 -48,-21.2 78,-21.2 -77,-19.2 -71,-19.2 -69,-19.2 -53,-19.2 -51,-19.2 -49,-19.2 -22.2,-18.1 -7.7,-18.1 6.8,-18 21.3,-18 35.8,-18 50.3,-18 64.8,-18 -78,-17.2 -76,-17.2 -72,-17.2 -70,-17.2 -68,-17.2 -64,-17.2 -62,-17.2 -44,-17.2 -18,-17.2 0,-17.2 14,-17.2 40,-17.2 42,-17.2 58,-17.2 70,-17.2 72,-17.2 76.3,-16.7 -38.6,-16.5 -77,-15.2 -75,-15.2 -69,-15.2 -63,-15.2 -53,-15.2 -51,-15.2 -45,-15.2 -43,-15.2 18.7,-14.5 33.2,-14.5 47.7,-14.5 -10.3,-14.4 4.2,-14.4 62.1,-14.3 -78,-13.2 -64,-13.2 -54,-13.2 -52,-13.2 -50,-13.2 -46,-13.2 -51,-11.2 -78,-9.2 -68,-9.2 -62,-9.2 -69,-7.2 -63,-7.2 -57,-7.2 -41,-7.2 -39,-7.2 -10.3,-6.7 -78,-5.2 -64,-5.2 -62,-5.2 -8,-5.2 -6,-5.2 -4,-5.2 -2,-5.2 0,-5.2 6,-5.2 8,-5.2 10,-5.2 12,-5.2 14,-5.2 20,-5.2 22,-5.2 24,-5.2 26,-5.2 28,-5.2 30,-5.2 36,-5.2 38,-5.2 40,-5.2 42,-5.2 44,-5.2 48,-5.2 50,-5.2 52,-5.2 54,-5.2 56,-5.2 58,-5.2 60,-5.2 66,-5.2 72,-5.2 74,-5.2 -30.6,-4.8 -69,-3.2 -29,-3.2 19,-3.2 21,-3.2 23,-3.2 25,-3.2 27,-3.2 33,-3.2 35,-3.2 37,-3.2 39,-3.2 41,-3.2 43,-3.2 45,-3.2 49,-3.2 51,-3.2 53,-3.2 55,-3.2 57,-3.2 59,-3.2 63,-3.2 65,-3.2 67,-3.2 73,-3.2 -78,-1.2 -68,-1.2 -50,-1.2 -48,-1.2 -46,-1.2 48,-1.2 50,-1.2 52,-1.2 54,-1.2 56,-1.2 62,-1.2 64,-1.2 66,-1.2 68,-1.2 72,-1.2 76,-1.2 -55,0.8 -51,0.8 -49,0.8 -47,0.8 -45,0.8 -25,0.8 75,0.8 -78,2.8 -76,2.8 -74,2.8 -48,2.8 60,2.8 62,2.8 64,2.8 66,2.8 68,2.8 76,2.8 -77,4.8 -75,4.8 -51,4.8 -49,4.8 -47,4.8 -45,4.8 -43,4.8 -41,4.8 21,4.8 23,4.8 25,4.8 27,4.8 29,4.8 33,4.8 35,4.8 37,4.8 39,4.8 41,4.8 43,4.8 51,4.8 53,4.8 55,4.8 57,4.8 63,4.8 65,4.8 67,4.8 73,4.8 -78,6.8 -76,6.8 -74,6.8 -22,6.8 -20,6.8 -16,6.8 -6,6.8 -2,6.8 6,6.8 28,6.8 38,6.8 42,6.8 52,6.8 56,6.8 64,6.8 76,6.8 -77,8.8 -75,8.8 -78,10.8 -76,10.8 -74,10.8 -52,10.8 -50,10.8 -48,10.8 -46,10.8 -44,10.8 -42,10.8 -40,10.8 -77,12.8 -75,12.8 -73,12.8 -51,12.8 -49,12.8 -47,12.8 -45,12.8 -43,12.8 -41,12.8 -37,12.8 -78,14.8 -76,14.8 -56,14.8 -48,14.8 -46,14.8 -44,14.8 -42,14.8 -40,14.8 -77,16.8 -55,16.8 -45,16.8 -43,16.8 -41,16.8 -37,16.8 -19,16.8 -5,16.8 -3,16.8 9,16.8 53,16.8 67,16.8 -13.2,18.2 1.3,18.2 15.9,18.2 30.3,18.2 44.8,18.2 59.3,18.2 -78,18.8 -76,18.8 -64,18.8 -52,18.8 -77,20.8 -78,22.8 -76,22.8 -24,22.8 6,22.8 20,22.8 34,22.8 64,22.8 -77,24.8 -23,24.8 -9,24.8 5,24.8 21,24.8 35,24.8 49,24.8 63,24.8 -78,26.8 -76,26.8 -77,28.8 -78,30.8 -76,30.8 78,30.8 -61,32.8 -60,34.8 78,34.8 -61,36.8 -68,38.8 -66,38.8 -62,38.8 -60,38.8 -69,40.8 -67,40.8 -61,40.8 79,40.8
  other v2: 77.8,23 77.8,24.967 77.8,26.933 77.8,28.9
MGND: ..2@-42.9,31.4 ..3@-47.3,39.691 ..6 B1.9 B1.12 B2.9 B2.12 C74.1 C75.1 C76.1 C77.2 C81.1 C82.1 C83.1 J48.3 J48.6 U32.3 U33.3 | length 103.4
  Top Layer w0.254: B1.12@-51.975,26.025 -51.975,24.808 ; B1.9@-50.025,26.025 -50.073,25.977 -50.073,25.44 -50.613,24.9 -51.883,24.9 -51.975,24.808 ; C74.1@-47.8,29.7 C75.1@-46,29.7 C76.1@-44.2,29.7 -43.993,29.493 -43.293,29.493 U33.3@-43,29.2 ; ..3@-47.3,39.691 ..3@-47.209,39.6 ; ..6@-46.775,34.166 -47.3,34.691 -47.825,34.166 -47.825,33.075 -49.6,31.3 -51.716,31.3 -52.327,30.689 -52.327,29.911 -52.615,29.623 -54.823,29.623 -55.1,29.9 -55.1,30.6 -55.5,31 -57.3,31 -58.2,30.1 U32.3@-58.2,29.2 -57.3,28.3 -57.3,26.921 -55.025,24.646 -52.137,24.646 -51.975,24.808 ; ..2@-42.9,31.4 -42.9,29.3 U33.3@-43,29.2 ; B2.12@-36.775,26.025 -36.727,25.977 -36.727,25.44 -36.435,25.148 -36.2,25.148 ; C81.1@-32.6,30.2 C82.1@-30.8,30.2 C83.1@-29,30.2 ; C83.1@-28.967,30.2 -28.603,29.836 -28.603,29.503 -27.3,28.2 -28.2,27.3 -33.242,27.3 -34.094,26.448 -34.777,26.448 -34.873,26.352 -34.873,25.44 -35.165,25.148 -36.2,25.148 ; C77.2@-27.2,28.2 C77.2@-26.908,28.492 ; U33.3@-43,29.2 -43,27.821 -39.825,24.646 -36.702,24.646 -36.2,25.148
  Top Layer w0.4: ..3@-47.209,39.6 -44.4,39.6 -42.9,38.1 -42.9,34.166 ; ..6@-46.775,34.166 -42.9,34.166 ; ..2@-42.9,31.4 -42.9,34.166 ; J48.6@-32.1,34.191 -28.691,34.191 ; J48.3@-32.1,39.691 -28.564,39.691 -26.8,37.927 -26.8,34.425 -27.034,34.191 -28.691,34.191 ; C77.2@-26.908,28.492 -26.885,28.469 -26.673,28.469 -26.2,28.942 -26.2,31.7 -28.691,34.191
MODE: JP1.2 U29.93 | length 21.2
  Bottom Layer w0.254: JP1.2@-75.9,-10.84 -63.76,-10.84 -61.1,-13.5 U29.93@-55.85,-13.5
NetB1_1: B1.1 U29.81 | length 47.4
  Top Layer w0.254: v1(-58.1,-19.9) -60.408,-17.592 -60.408,-7.608 -53.9,-1.1 -53.9,19.6 -54.575,20.275 B1.1@-54.575,21.175
  Bottom Layer w0.254: v1(-58.1,-19.9) -57.898,-19.9 -57.498,-19.5 U29.81@-55.85,-19.5
NetB1_4: B1.4 U29.82 | length 45.9
  Top Layer w0.254: v1(-58.1,-18.5) -59.954,-16.646 -59.954,-7.796 -53.4,-1.242 -53.4,19.6 -52.625,20.375 B1.4@-52.625,21.175
  Bottom Layer w0.254: v1(-58.1,-18.5) -57.898,-18.5 -57.398,-19 U29.82@-55.85,-19
NetB1_10: B1.10 B1.11 C74.2 C75.2 C76.2 | length 9.4
  Top Layer w0.254: B1.11@-51.325,26.025 -51.325,26.851 -51.151,27.025 -50.526,27.025 ; B1.10@-50.675,26.025 -50.675,26.876 -50.526,27.025 ; C76.2@-44.2,27.7 C75.2@-46,27.7 C74.2@-47.8,27.7 -47.832,27.668 -48.632,27.668 -49.275,27.025 -50.526,27.025
NetB1_14: ..1@-51.5,28.3 ..2@-52.95,28.05 B1.14 U32.1 | length 9.8
  Top Layer w0.254: U32.1@-56.2,28.26 -55.3,27.36 -55.3,25.563 -54.885,25.148 -53.615,25.148 -53.323,25.44 -53.323,25.977 B1.14@-53.275,26.025 -53.245,26.055 -53.245,26.956 -52.95,27.251 ..2@-52.95,28.05 -52.95,28.227 -52.877,28.3 ..1@-51.5,28.3
NetB1_15: ..1@-54.25,28.05 ..2@-51.5,30.1 B1.15 U32.2 | length 8.7
  Top Layer w0.254: U32.2@-56.2,30.14 -56.2,30.11 -54.413,28.323 -54.323,28.323 -54.25,28.25 ..1@-54.25,28.05 -54.207,28.007 -54.207,27.269 -53.925,26.986 B1.15@-53.925,26.025 ; ..1@-54.177,28.245 -54.177,28.323 -54.099,28.323 -53.277,29.144 -52.356,29.144 -51.5,30 ..2@-51.5,30.1
NetB2_1: B2.1 U29.51 | length 52.6
  Top Layer w0.254: v1(-41.8,-25.3) -39.8,-25.3 -37,-22.5 -37,-2.6 -38.654,-0.946 -38.654,19.654 -39.375,20.375 B2.1@-39.375,21.175
  Bottom Layer w0.254: U29.51@-42.3,-23.55 -42.3,-24.807 -41.807,-25.3 v1(-41.8,-25.3)
NetB2_4: B2.4 U29.52 | length 55.2
  Top Layer w0.254: v1(-43.2,-25.3) -42.373,-26.127 -39.927,-26.127 -36.546,-22.746 -36.546,-2.354 -38.2,-0.7 -38.2,19.6 -37.425,20.375 B2.4@-37.425,21.175
  Bottom Layer w0.254: v1(-43.2,-25.3) -43.2,-25.207 -42.8,-24.807 U29.52@-42.8,-23.55
NetB2_10: B2.10 B2.11 C81.2 C82.2 C83.2 | length 9.7
  Top Layer w0.254: B2.11@-36.125,26.025 -36.125,26.975 -35.975,27.125 -35.475,27.125 ; B2.10@-35.475,26.025 -35.475,27.125 ; C83.2@-29,28.2 C81.2@-32.6,28.2 -32.897,27.903 -33.281,27.903 -34.059,27.125 -35.475,27.125
NetB2_14: ..1@-36.3,28.3 ..2@-37.75,28.05 B2.14 U33.1 | length 9.8
  Top Layer w0.254: U33.1@-41,28.26 -40.196,27.456 -40.196,25.659 -39.685,25.148 -38.415,25.148 -38.123,25.44 -38.123,25.977 B2.14@-38.075,26.025 -38.075,26.986 -37.792,27.269 -37.792,28.008 ..2@-37.75,28.05 -37.75,28.227 -37.677,28.3 ..1@-36.3,28.3
NetB2_15: ..1@-39.05,28.05 ..2@-36.3,30.1 B2.15 U33.2 | length 8.6
  Top Layer w0.254: U33.2@-41,30.14 -41,30.11 -39.213,28.323 -39.123,28.323 ..1@-39.05,28.25 ; B2.15@-38.725,26.025 -38.725,26.986 -39.007,27.269 -39.007,28.007 ..1@-39.05,28.05 ..1@-39.05,28.25 ; ..2@-36.3,30.1 -36.3,30.067 -36.664,29.703 -36.697,29.703 -37.2,29.2 -38.1,29.2 ..1@-39.05,28.25
NetC43_2: C43.2 FUSE_SMD1.2 J46.A4B9 J46.B4A9 | length 19.3
  Top Layer w0.254: J46.A4B9@-62.64,-36.181 -62.64,-36.441 -62.4,-36.681 -62.4,-38.2 -61.8,-38.8 -58.9,-38.8 -58.2,-38.1 ; C43.2@-58.9,-32.8 -57.94,-33.76 J46.B4A9@-57.94,-35.78 -57.963,-35.803 -57.963,-36.464 -58.2,-36.701 -58.2,-38.1 ; FUSE_SMD1.2@-53.8,-35.6 -53.8,-37.6 -54.3,-38.1 -58.2,-38.1
NetC44_2: C44.2 U29.13 X1.1 | length 13.7
  Bottom Layer w0.254: U29.13@-48.3,-8.45 -48.3,-6.658 -43.573,-1.931 -43.573,-1.276 -42.997,-0.7 X1.1@-42.95,-0.7 -43.2,-0.45 C44.2@-43.2,2.9
NetC45_2: C45.2 U29.12 X1.2 | length 13.6
  Bottom Layer w0.254: X1.2@-54.15,-0.7 -53.9,-0.45 C45.2@-53.9,2.9 ; X1.2@-54.103,-0.7 -53.527,-1.276 -53.527,-1.931 -48.8,-6.658 U29.12@-48.8,-8.45
NetC48_2: C48.2 U29.73 | length 4.3
  Bottom Layer w0.254: C48.2@-55.8,-25.8 -54.1,-25.8 -53.309,-25.009 -53.309,-23.559 U29.73@-53.3,-23.55
NetC49_2: C49.2 U29.49 | length 4.2
  Bottom Layer w0.254: U29.49@-40.75,-21.5 -40.741,-21.509 -39.801,-21.509 -38.5,-22.81 C49.2@-38.5,-24.2
NetC57_1: C57.1 U30.6 | length 2.7
  Bottom Layer w0.254: U30.6@-61.584,15.835 -60.265,15.835 C57.1@-59.3,16.8
NetC58_1: C58.1 U30.7 | length 2.3
  Bottom Layer w0.254: U30.7@-61.584,14.565 -59.335,14.565 C58.1@-59.3,14.6
NetC58_2: C58.2 L1.1 U30.8
NetC70_1: ..1@-44.9,31.4 ..1@-49.5,30.1 ..2@-49.5,28.3 | length 7
  Top Layer w0.254: ..2@-49.5,28.3 ..1@-49.5,30.1 -49.5,30.133 -49.136,30.497 -49.103,30.497 -48.4,31.2 -45.1,31.2 ..1@-44.9,31.4
NetC77_1: ..1@-34.3,30.1 ..2@-34.3,28.3 C77.1 | length 9.7
  Top Layer w0.254: ..2@-34.3,28.3 ..1@-34.3,30.1 -34.3,30.2 -33.473,31.027 -28.127,31.027 -27.3,30.2 C77.1@-27.2,30.2
NetD1_1: D1.1 D2.C D3.C J2.5 U1.3 | length 4.7
  Top Layer w0.254: D1.1@-19.6,23.3 -19.6,23.6 -19.25,23.95 -18.575,23.95 -16.525,26 D3.C@-16.215,26
NetD1_2: D1.2 R10.1 | length 2.2
  Top Layer w0.5: D1.2@-16.8,23.3 R10.1@-14.6,23.3
NetD2_A: D2.A D3.A J2.3 R10.2 R11.1 U2.3 | length 3.4
  Top Layer w0.254: U2.3@-11.945,19.15 -12.25,19.15 -12.8,19.7 -12.8,20.951 -12.651,21.1 R11.1@-11.8,21.1
NetD4_1: D4.1 D5.C D6.C J5.5 U3.3 | length 4.7
  Top Layer w0.254: D4.1@-5.1,23.3 -5.1,23.6 -4.75,23.95 -4.075,23.95 -2.025,26 D6.C@-1.715,26
NetD4_2: D4.2 R25.1 | length 2.2
  Top Layer w0.5: D4.2@-2.3,23.3 R25.1@-0.1,23.3
NetD5_A: D5.A D6.A J5.3 R25.2 R26.1 U4.3 | length 3.4
  Top Layer w0.254: U4.3@2.555,19.15 2.25,19.15 1.7,19.7 1.7,20.951 1.849,21.1 R26.1@2.7,21.1
NetD7_1: D7.1 D8.C D9.C J8.5 U5.3 | length 4.7
  Top Layer w0.254: D7.1@9.4,23.3 9.4,23.6 9.75,23.95 10.425,23.95 12.475,26 D9.C@12.785,26
NetD7_2: D7.2 R40.1 | length 2.2
  Top Layer w0.5: D7.2@12.2,23.3 R40.1@14.4,23.3
NetD8_A: D8.A D9.A J8.3 R40.2 R41.1 U6.3 | length 3.4
  Top Layer w0.254: U6.3@17.055,19.15 16.75,19.15 16.2,19.7 16.2,20.951 16.349,21.1 R41.1@17.2,21.1
NetD10_1: D10.1 D11.C D12.C J11.5 U7.3 | length 4.7
  Top Layer w0.254: D10.1@23.9,23.3 23.9,23.6 24.25,23.95 24.925,23.95 26.975,26 D12.C@27.285,26
NetD10_2: D10.2 R55.1 | length 2.2
  Top Layer w0.5: D10.2@26.7,23.3 R55.1@28.9,23.3
NetD11_A: D11.A D12.A J11.3 R55.2 R56.1 U8.3 | length 3.4
  Top Layer w0.254: U8.3@31.555,19.15 31.25,19.15 30.7,19.7 30.7,20.951 30.849,21.1 R56.1@31.7,21.1
NetD13_1: D13.1 D14.C D15.C J14.5 U9.3 | length 4.7
  Top Layer w0.254: D13.1@38.4,23.3 38.4,23.6 38.75,23.95 39.425,23.95 41.475,26 D15.C@41.785,26
NetD13_2: D13.2 R70.1 | length 2.2
  Top Layer w0.5: D13.2@41.2,23.3 R70.1@43.4,23.3
NetD14_A: D14.A D15.A J14.3 R70.2 R71.1 U10.3 | length 3.4
  Top Layer w0.254: U10.3@46.055,19.15 45.75,19.15 45.2,19.7 45.2,20.951 45.349,21.1 R71.1@46.2,21.1
NetD16_1: D16.1 D17.C D18.C J17.5 U11.3 | length 4.7
  Top Layer w0.254: D16.1@52.9,23.3 52.9,23.6 53.25,23.95 53.925,23.95 55.975,26 D18.C@56.285,26
NetD16_2: D16.2 R85.1 | length 2.2
  Top Layer w0.5: D16.2@55.7,23.3 R85.1@57.9,23.3
NetD17_A: D17.A D18.A J17.3 R85.2 R86.1 U12.3 | length 3.4
  Top Layer w0.254: U12.3@60.555,19.15 60.25,19.15 59.7,19.7 59.7,20.951 59.849,21.1 R86.1@60.7,21.1
NetD19_1: D19.1 D20.C D21.C J20.5 U13.3 | length 6
  Top Layer w0.254: D19.1@67.4,23.3 67.4,23.6 67.75,23.95 68.425,23.95 70.475,26 D21.C@70.785,26
  Top Layer w0.5: D19.1@67.4,23.3 D19.1@67.4,23.6 ; D21.C@70.285,25.5 D21.C@70.785,26
  Top Layer w1: D21.C@70.475,26 D21.C@70.785,26
NetD19_2: D19.2 R100.1 | length 2.2
  Top Layer w0.5: D19.2@70.2,23.3 R100.1@72.4,23.3
NetD20_A: D20.A D21.A J20.3 R100.2 R101.1 U14.3 | length 3.4
  Top Layer w0.254: U14.3@75.055,19.15 74.75,19.15 74.2,19.7 74.2,20.951 74.349,21.1 R101.1@75.2,21.1
NetD22_1: D22.1 D23.C D24.C J23.5 U15.3 | length 4.7
  Top Layer w0.254: D24.C@67.815,-25.9 68.125,-25.9 70.175,-23.85 70.85,-23.85 71.2,-23.5 D22.1@71.2,-23.2
NetD22_2: D22.2 R115.1 | length 2.2
  Top Layer w0.5: R115.1@66.2,-23.2 D22.2@68.4,-23.2
NetD23_A: D23.A D24.A J23.3 R115.2 R116.1 U16.3 | length 3.4
  Top Layer w0.254: R116.1@63.4,-21 64.251,-21 64.4,-20.851 64.4,-19.6 63.85,-19.05 U16.3@63.545,-19.05
NetD25_1: D25.1 D26.C D27.C J26.5 U17.3 | length 4.7
  Top Layer w0.254: D27.C@53.315,-25.9 53.625,-25.9 55.675,-23.85 56.35,-23.85 56.7,-23.5 D25.1@56.7,-23.2
NetD25_2: D25.2 R130.1 | length 2.2
  Top Layer w0.5: R130.1@51.7,-23.2 D25.2@53.9,-23.2
NetD26_A: D26.A D27.A J26.3 R130.2 R131.1 U18.3 | length 3.4
  Top Layer w0.254: R131.1@48.9,-21 49.751,-21 49.9,-20.851 49.9,-19.6 49.35,-19.05 U18.3@49.045,-19.05
NetD28_1: D28.1 D29.C D30.C J29.5 U19.3 | length 4.7
  Top Layer w0.254: D30.C@38.815,-25.9 39.125,-25.9 41.175,-23.85 41.85,-23.85 42.2,-23.5 D28.1@42.2,-23.2
NetD28_2: D28.2 R145.1 | length 2.2
  Top Layer w0.5: R145.1@37.2,-23.2 D28.2@39.4,-23.2
NetD29_A: D29.A D30.A J29.3 R145.2 R146.1 U20.3 | length 3.4
  Top Layer w0.254: R146.1@34.4,-21 35.251,-21 35.4,-20.851 35.4,-19.6 34.85,-19.05 U20.3@34.545,-19.05
NetD31_1: D31.1 D32.C D33.C J32.5 U21.3 | length 4.7
  Top Layer w0.254: D33.C@24.315,-25.9 24.625,-25.9 26.675,-23.85 27.35,-23.85 27.7,-23.5 D31.1@27.7,-23.2
NetD31_2: D31.2 R160.1 | length 2.2
  Top Layer w0.5: R160.1@22.7,-23.2 D31.2@24.9,-23.2
NetD32_A: D32.A D33.A J32.3 R160.2 R161.1 U22.3 | length 3.4
  Top Layer w0.254: R161.1@19.9,-21 20.751,-21 20.9,-20.851 20.9,-19.6 20.35,-19.05 U22.3@20.045,-19.05
NetD34_1: D34.1 D35.C D36.C J35.5 U23.3 | length 4.7
  Top Layer w0.254: D36.C@9.815,-25.9 10.125,-25.9 12.175,-23.85 12.85,-23.85 13.2,-23.5 D34.1@13.2,-23.2
NetD34_2: D34.2 R175.1 | length 2.2
  Top Layer w0.5: R175.1@8.2,-23.2 D34.2@10.4,-23.2
NetD35_A: D35.A D36.A J35.3 R175.2 R176.1 U24.3 | length 3.4
  Top Layer w0.254: R176.1@5.4,-21 6.251,-21 6.4,-20.851 6.4,-19.6 5.85,-19.05 U24.3@5.545,-19.05
NetD37_1: D37.1 D38.C D39.C J38.5 U25.3 | length 4.7
  Top Layer w0.254: D39.C@-4.685,-25.9 -4.375,-25.9 -2.325,-23.85 -1.65,-23.85 -1.3,-23.5 D37.1@-1.3,-23.2
NetD37_2: D37.2 R190.1 | length 2.2
  Top Layer w0.5: R190.1@-6.3,-23.2 D37.2@-4.1,-23.2
NetD38_A: D38.A D39.A J38.3 R190.2 R191.1 U26.3 | length 3.4
  Top Layer w0.254: R191.1@-9.1,-21 -8.249,-21 -8.1,-20.851 -8.1,-19.6 -8.65,-19.05 U26.3@-8.955,-19.05
NetD40_1: D40.1 D41.C D42.C J41.5 U27.3 | length 4.7
  Top Layer w0.254: D42.C@-19.185,-25.9 -18.875,-25.9 -16.825,-23.85 -16.15,-23.85 -15.8,-23.5 D40.1@-15.8,-23.2
NetD40_2: D40.2 R205.1 | length 2.2
  Top Layer w0.5: R205.1@-20.8,-23.2 D40.2@-18.6,-23.2
NetD41_A: D41.A D42.A J41.3 R205.2 R206.1 U28.3 | length 3.4
  Top Layer w0.254: R206.1@-23.6,-21 -22.749,-21 -22.6,-20.851 -22.6,-19.6 -23.15,-19.05 U28.3@-23.455,-19.05
NetD43_2: D43.2 D44.2 FH1.1
NetD46_2: D46.2 R218.2 | length 2.7
  Top Layer w0.254: D46.2@-76.3,35.6 R218.2@-76.3,38.3
NetD47_2: D47.2 R219.2 | length 2.3
  Top Layer w0.5: R219.2@-73.7,17.1 D47.2@-71.4,17.1
NetD48_2: D48.2 R220.2 | length 2.1
  Top Layer w0.254: D48.2@-63,-2.8 R220.2@-60.9,-2.8
NetJ1_1: J1.1 R4.1 R5.1 | length 3.8
  Bottom Layer w1: R4.1@-19.4,13 R5.1@-17.1,13 ; R5.1@-17.495,13.395 J1.1@-17.495,14.945
NetJ1_2: J1.2 Q1.3 | length 3.5
  Bottom Layer w0.5: Q1.3@-23.5,17.36 -22.48,17.36 J1.2@-20.755,15.635
NetJ1_3: J1.3 R6.1 R7.1 | length 4.9
  Bottom Layer w0.254: R6.1@-23.7,27 R7.1@-21.4,27 -21.127,26.727 -21.127,25.707 -20.848,25.428 -20.848,25.424 -20.273,24.85 J1.3@-20.27,24.85
NetJ1_4: J1.4 R2.2 R3.2 U1.1 | length 14.8
  Top Layer w0.254: v2(-21.2,23.2) -21.2,24.651 -20,25.851 -20,27.903 U1.1@-20.501,28.405
  Bottom Layer w0.254: v2(-21.2,23.2) -19.423,23.2 J1.4@-17.873,24.75 ; R2.2@-19.1,27 R3.2@-16.8,27 -16.8,25.777 -17.727,24.85 J1.4@-17.73,24.85 J1.4@-17.8,24.78
NetJ3_1: J3.1 R12.1 R13.1 | length 4.2
  Bottom Layer w1.2: J3.1@-14.635,24.955 R12.1@-14.635,26.865
  Bottom Layer w1.5: R12.1@-14.5,27 R13.1@-12.2,27
NetJ4_1: J4.1 R19.1 R20.1 | length 3.8
  Bottom Layer w1: R19.1@-4.9,13 R20.1@-2.6,13 ; R20.1@-2.995,13.395 J4.1@-2.995,14.945
NetJ4_2: J4.2 Q2.3 | length 3.5
  Bottom Layer w0.5: Q2.3@-9,17.36 -7.98,17.36 J4.2@-6.255,15.635
NetJ4_3: J4.3 R21.1 R22.1 | length 4.9
  Bottom Layer w0.254: R21.1@-9.2,27 R22.1@-6.9,27 -6.627,26.727 -6.627,25.707 -6.348,25.428 -6.348,25.424 -5.773,24.85 J4.3@-5.77,24.85
NetJ4_4: J4.4 R17.2 R18.2 U3.1 | length 14.8
  Top Layer w0.254: v2(-6.7,23.2) -6.7,24.651 -5.5,25.851 -5.5,27.903 U3.1@-6.001,28.405
  Bottom Layer w0.254: v2(-6.7,23.2) -4.923,23.2 J4.4@-3.373,24.75 ; R17.2@-4.6,27 R18.2@-2.3,27 -2.3,25.777 -3.227,24.85 J4.4@-3.23,24.85 J4.4@-3.3,24.78
NetJ6_1: J6.1 R27.1 R28.1 | length 4.2
  Bottom Layer w1.2: J6.1@-0.135,24.955 R27.1@-0.135,26.865
  Bottom Layer w1.5: R27.1@0,27 R28.1@2.3,27